# EAGLE board Orb Mainboard Rev B - 23 LEDs (EAGLE 9.7.0)
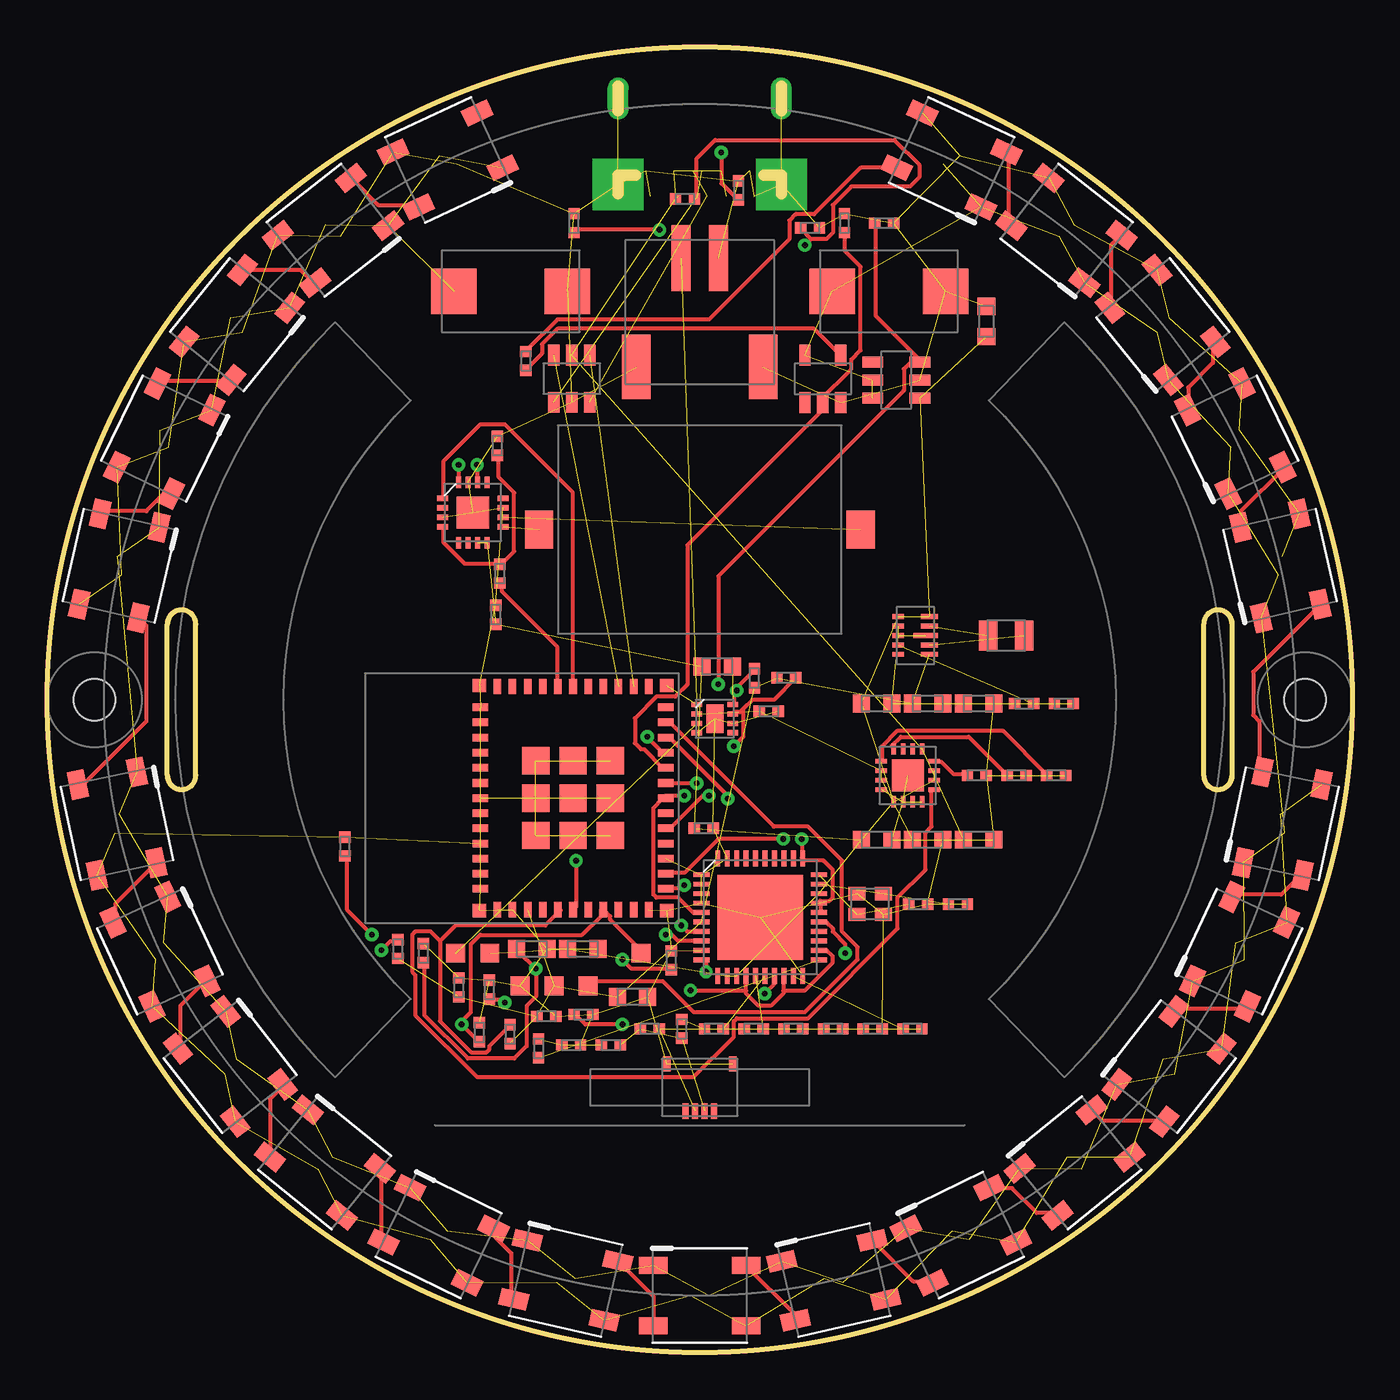
[diagram p0: board, top side]
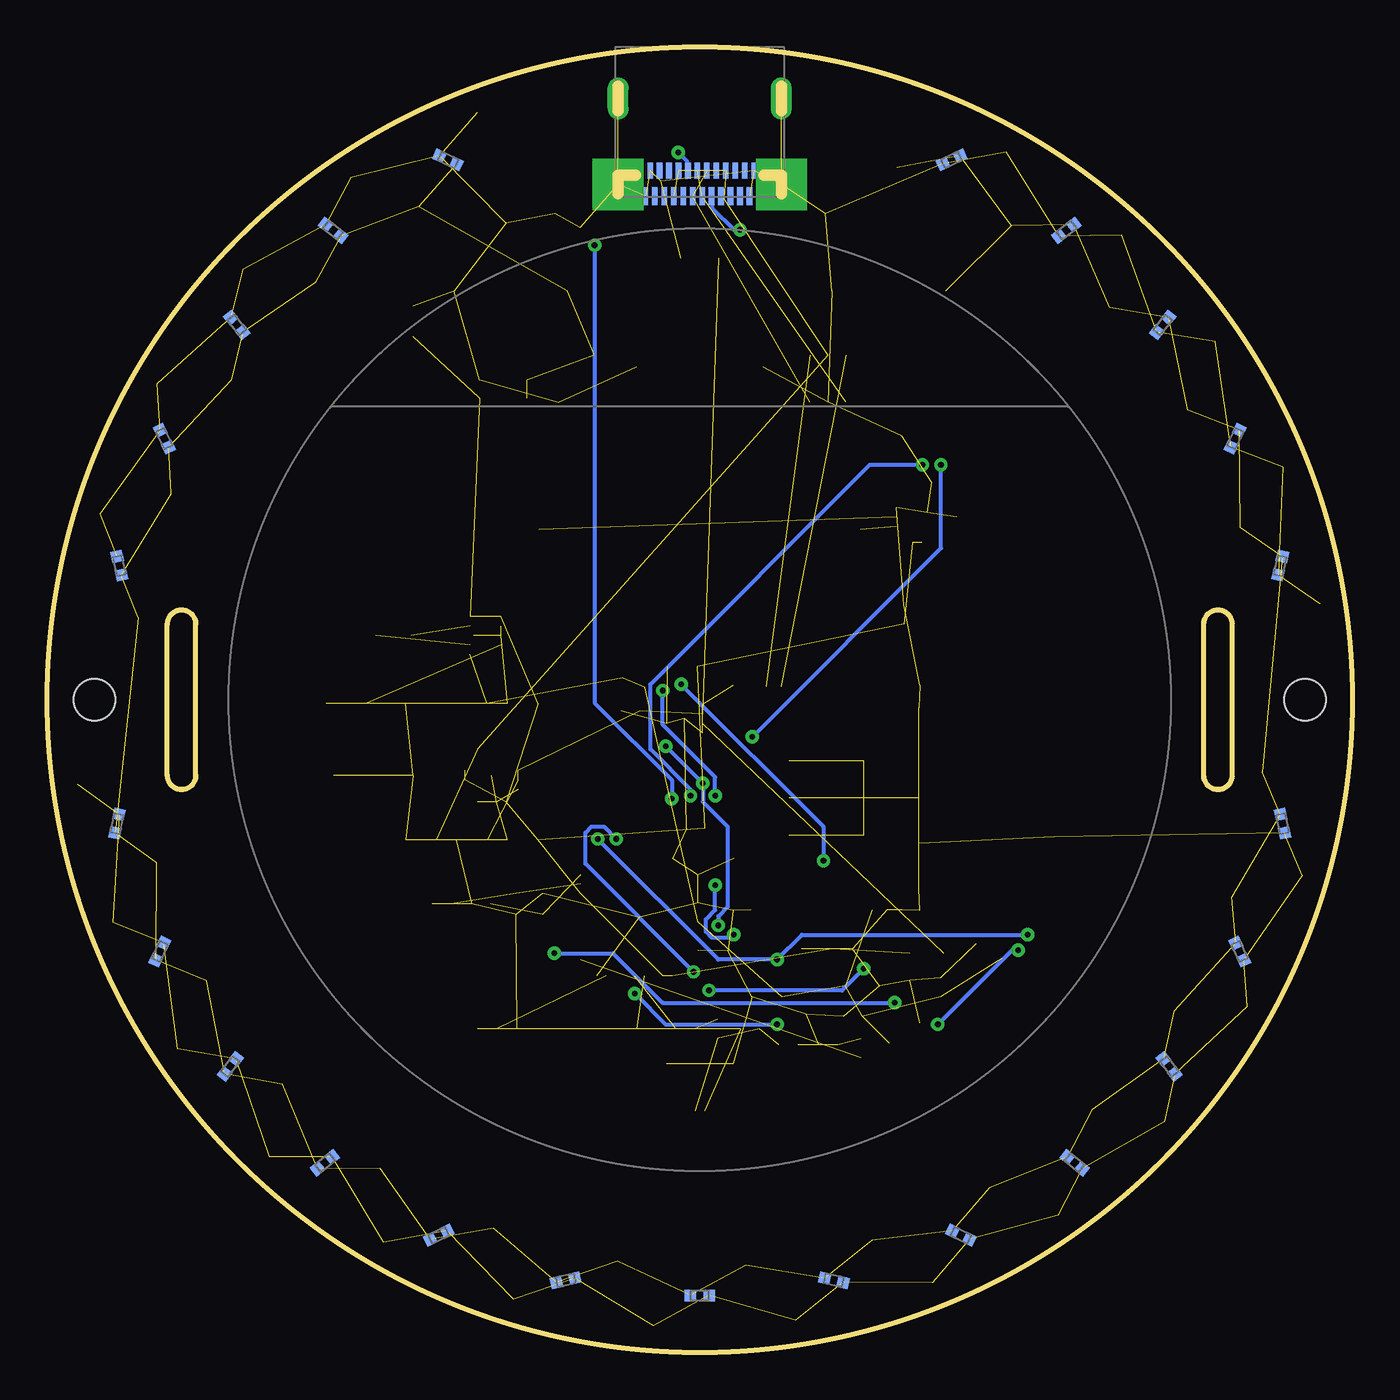
[diagram p1: board, bottom side, seen from below]

Size 69 x 69 mm. Coordinates in mm from the lower left corner, seen from the top.
Outline: 7.85,30.5 7.85,38.5 arc180 6.35,38.5 6.35,30.5 arc180 7.85,30.5
Outline: 62.65,30.5 62.65,38.5 arc180 61.15,38.5 61.15,30.5 arc180 62.65,30.5
Outline: circle at 34.5,34.5 radius 34.5
Copper layers (1*16): Top / Bottom
Stack-up Default Layer Stack: Top User Defined 0.035mm / Dielectric-1 User Defined 1.5mm / Bottom User Defined 0.035mm
Design rules: minimum drill size class=0 0.3mm, minimum drill size 0.3mm, minimum copper width class=0 0.2mm, minimum copper width 0.15mm, keepout clearance 0mil, drill distance 6mil, via restrict clearance 0mil, dimension clearance 0.25mm, restrict clearance 0mil, copper clearance wire_polygon to wire_polygon 5mil, copper clearance wire_polygon to pad_smd 5mil, copper clearance wire_polygon to via 5mil, copper clearance pad_smd to pad_smd 5mil, copper clearance pad_smd to via 5mil, copper clearance via to via 5mil, copper clearance smd to pad (same net) 5mil, copper clearance smd to via (same net) 5mil, copper clearance smd to smd (same net) 5mil
Net classes: 0 default: width 0.2 mm, drill 0.3 mm
Holes 2.2 mm at 2.5,34.5 66.5,34.5
RestrictCopper: area -0.1,32 to 5.1,37; area 63.9,32 to 69.1,37; area 49.7,14.5 to 62.3,54.5; area 6.7,14.5 to 19.3,54.5
vRestrict: area 49.7,14.5 to 62.3,54.5; area 6.7,14.5 to 19.3,54.5

## Footprints (pad centres in the part's own frame; a part is rotated, then mirrored left to right if it is on the bottom)
C0603 = smd 0.9 x 0.95: 1 -0.8,0; 2 0.8,0
C0402 = smd 0.6 x 0.6: 1 -0.5,0; 2 0.5,0
CPOL7343 = smd 2.4 x 2.4: 1 -3,0; 2 3,0
SOT23_6 = smd 0.6 x 1.1: 1 -0.95,-1.25; 2 0,-1.25; 3 0.95,-1.25; 4 0.95,1.25; 5 0,1.25; 6 -0.95,1.25
USBC24_TE2345986 = smd 0.3 x 0.95: A1 2.625,-7.875; A2 2.125,-7.875; A3 1.625,-7.875; A4 1.125,-7.875; A5 0.625,-7.875; A6 0.125,-7.875; A7 -0.375,-7.875; A8 -0.875,-7.875; A9 -1.375,-7.875; A10 -1.875,-7.875; A11 -2.375,-7.875; A12 -2.875,-7.875 | smd 0.3 x 0.85: B1 -2.625,-6.525; B2 -2.125,-6.525; B3 -1.625,-6.525; B4 -1.125,-6.525; B5 -0.625,-6.525; B6 -0.125,-6.525; B7 0.375,-6.525; B8 0.875,-6.525; B9 1.375,-6.525; B10 1.875,-6.525; B11 2.375,-6.525; B12 2.875,-6.525 | drill 0.6 pad 2.7 square: S1 -4.32,-7.25; S2 4.32,-7.25 | drill 0.6 pad 1.075 long: S3 -4.32,-2.7; S4 4.32,-2.7
JST_S2B_PH_SM4_TB = smd 1 x 3.5: 1 -1,2.85; 2 1,2.85 | smd 1.5 x 3.4: S1 -3.35,-2.9; S2 3.35,-2.9
FPC4_PLACEHOLDER = smd 0.3 x 0.8: 1 0.75,-1.25; 2 0.25,-1.25; 3 -0.25,-1.25; 4 -0.75,-1.25 | smd 0.4 x 0.8: M1 -1.75,1.25; M2 1.75,1.25
L2016 = smd 1 x 1.6: 1 -0.95,0; 2 0.95,0
L0402 = smd 0.6 x 0.6: 1 -0.5,0; 2 0.5,0
WS2812B_5050 = smd 1.5 x 0.9: 1 -2.45,1.6; 2 -2.45,-1.6; 3 2.45,-1.6; 4 2.45,1.6
R0402 = smd 0.6 x 0.6: 1 -0.5,0; 2 0.5,0
SPK_PADS = smd 1.5 x 2: 1 -8.5,0; 2 8.5,0
TP1MM = smd 1 x 1: 1 0,0
ESP32C3MINI1_PLACEHOLDER = smd 0.8 x 0.4: 1 -5.9,1.3; 2 -5.9,0.5; 3 -5.9,-0.3; 4 -5.9,-1.1; 5 -5.9,-1.9; 6 -5.9,-2.7; 7 -5.9,-3.5; 8 -5.9,-4.3; 9 -5.9,-5.1; 10 -5.9,-5.9; 11 -5.9,-6.7; 25 5.9,-6.7; 26 5.9,-5.9; 27 5.9,-5.1; 28 5.9,-4.3; 29 5.9,-3.5; 30 5.9,-2.7; 31 5.9,-1.9; 32 5.9,-1.1; 33 5.9,-0.3; 34 5.9,0.5; 35 5.9,1.3 | smd 0.4 x 0.8: 12 -4.8,-7.6; 13 -4,-7.6; 14 -3.2,-7.6; 15 -2.4,-7.6; 16 -1.6,-7.6; 17 -0.8,-7.6; 18 0,-7.6; 19 0.8,-7.6; 20 1.6,-7.6; 21 2.4,-7.6; 22 3.2,-7.6; 23 4,-7.6; 24 4.8,-7.6; 36 4.8,2.2; 37 4,2.2; 38 3.2,2.2; 39 2.4,2.2; 40 1.6,2.2; 41 0.8,2.2; 42 0,2.2; 43 -0.8,2.2; 44 -1.6,2.2; 45 -2.4,2.2; 46 -3.2,2.2; 47 -4,2.2; 48 -4.8,2.2 | smd 1.45 x 1.45: 49 -1.975,-0.725; 49_1 -1.975,-2.7; 49_2 -1.975,-4.675; 49_3 0,-0.725; 49_4 0,-2.7; 49_5 0,-4.675; 49_6 1.975,-0.725; 49_7 1.975,-2.7; 49_8 1.975,-4.675 | smd 0.7 x 0.7: 50 5.95,2.25; 51 5.95,-7.65; 52 -5.95,-7.65; 53 -5.95,2.25
HVQFN40_6X6 = smd 0.85 x 0.25: 1 -3.1,2.25; 2 -3.1,1.75; 3 -3.1,1.25; 4 -3.1,0.75; 5 -3.1,0.25; 6 -3.1,-0.25; 7 -3.1,-0.75; 8 -3.1,-1.25; 9 -3.1,-1.75; 10 -3.1,-2.25; 21 3.1,-2.25; 22 3.1,-1.75; 23 3.1,-1.25; 24 3.1,-0.75; 25 3.1,-0.25; 26 3.1,0.25; 27 3.1,0.75; 28 3.1,1.25; 29 3.1,1.75; 30 3.1,2.25 | smd 0.25 x 0.85: 11 -2.25,-3.1; 12 -1.75,-3.1; 13 -1.25,-3.1; 14 -0.75,-3.1; 15 -0.25,-3.1; 16 0.25,-3.1; 17 0.75,-3.1; 18 1.25,-3.1; 19 1.75,-3.1; 20 2.25,-3.1; 31 2.25,3.1; 32 1.75,3.1; 33 1.25,3.1; 34 0.75,3.1; 35 0.25,3.1; 36 -0.25,3.1; 37 -0.75,3.1; 38 -1.25,3.1; 39 -1.75,3.1; 40 -2.25,3.1 | smd 4.5 x 4.5: 41 0,0
TDFN8_2X2 = smd 0.55 x 0.28: 1 -0.95,0.75; 2 -0.95,0.25; 3 -0.95,-0.25; 4 -0.95,-0.75; 5 0.95,-0.75; 6 0.95,-0.25; 7 0.95,0.25; 8 0.95,0.75 | smd 0.9 x 1.5: 9 0,0
VQFN16_3X3 = smd 0.6 x 0.24: 1 -1.4,0.75; 2 -1.4,0.25; 3 -1.4,-0.25; 4 -1.4,-0.75; 9 1.4,-0.75; 10 1.4,-0.25; 11 1.4,0.25; 12 1.4,0.75 | smd 0.24 x 0.6: 5 -0.75,-1.4; 6 -0.25,-1.4; 7 0.25,-1.4; 8 0.75,-1.4; 13 0.75,1.4; 14 0.25,1.4; 15 -0.25,1.4; 16 -0.75,1.4 | smd 1.68 x 1.68: 17 0,0
VSON10_2X3 = smd 0.6 x 0.25: 1 -0.9,1; 2 -0.9,0.5; 3 -0.9,0; 4 -0.9,-0.5; 5 -0.9,-1 | smd 0.9 x 0.25: 6 0.75,-1; 7 0.75,-0.5; 9 0.75,0.5; 10 0.75,1 | smd 1.3 x 0.25: 8 0.55,0
TQFN16_3X3 = smd 0.6 x 0.28: 1 -1.6,0.75; 2 -1.6,0.25; 3 -1.6,-0.25; 4 -1.6,-0.75; 9 1.6,-0.75; 10 1.6,-0.25; 11 1.6,0.25; 12 1.6,0.75 | smd 0.28 x 0.6: 5 -0.75,-1.6; 6 -0.25,-1.6; 7 0.25,-1.6; 8 0.75,-1.6; 13 0.75,1.6; 14 0.25,1.6; 15 -0.25,1.6; 16 -0.75,1.6 | smd 1.7 x 1.7: 17 0,0
SOT23_5 = smd 0.6 x 1.1: 1 -0.95,-1.25; 2 0,-1.25; 3 0.95,-1.25; 4 0.95,1.25; 5 -0.95,1.25
XTAL2016 = smd 0.9 x 0.7: 1 -0.7,-0.55; 2 0.7,-0.55; 3 0.7,0.55; 4 -0.7,0.55

## Placement (x,y rotation side)
C1  10uF  [C0603]  30.95,18.8 0 top
C2  100nF  [C0402]  26.39,17.76 0 top
C3  1uF  [C0402]  22.85,16.92 90 top
C4  4.7uF  [C0603]  49.25,27.1 0 top
C5  10uF  [C0603]  43.85,27.1 0 top
C6  10uF  [C0603]  46.55,27.1 0 top
C7  100nF  [C0402]  38.15,33.9 0 top
C8  10uF  [C0603]  43.85,34.3 0 top
C9  10uF  [C0603]  46.55,34.3 0 top
C10  10uF  [C0603]  49.25,34.3 0 top
C11  100nF  [C0402]  34.71,27.7 0 top
C12  4.7uF  [C0603]  28.32,21.33 0 top
C13  4.7uF  [C0603]  25.62,21.33 0 top
C14  100nF  [C0402]  19.89,21.1 90 top
C15  1uF  [C0402]  15.74,26.74 90 top
C16  100nF  [C0402]  33,20.72 90 top
C17  100nF  [C0402]  28.35,17.86 0 top
C18  100nF  [C0402]  23.38,19.17 90 top
C19  100nF  [C0402]  21.77,19.29 90 top
C20  12pF  [C0402]  46.05,23.7 0 top
C21  12pF  [C0402]  48.15,23.7 0 top
C22  TBD  [C0402]  27.7,16.25 0 top
C23  TBD  [C0402]  43.65,17.1 0 top
C24  TBD  [C0402]  29.8,16.25 0 top
C25  TBD  [C0402]  41.55,17.1 0 top
C26  TBD  [C0402]  31.85,17.1 0 top
C27  TBD  [C0402]  33.55,17.1 90 top
C28  TBD  [C0402]  39.45,17.1 0 top
C29  10uF  [C0603]  35.42,36.27 0 top
C30  100nF  [C0402]  23.71,39 90 top
C31  10uF  [C0603]  49.65,54.5 90 top
C32  100uF  [CPOL7343]  24.5,56.1 0 top
C33  100uF  [CPOL7343]  44.5,56.1 0 top
C101  100nF  [C0402]  47.81,63.05 155 bottom
C102  100nF  [C0402]  53.89,59.32 142 bottom
C103  100nF  [C0402]  58.98,54.32 129 bottom
C104  100nF  [C0402]  62.81,48.31 116 bottom
C105  100nF  [C0402]  65.19,41.59 103 bottom
C106  100nF  [C0402]  65.31,27.95 78 bottom
C107  100nF  [C0402]  63.05,21.19 65 bottom
C108  100nF  [C0402]  59.32,15.11 52 bottom
C109  100nF  [C0402]  54.32,10.02 39 bottom
C110  100nF  [C0402]  48.31,6.19 26 bottom
C111  100nF  [C0402]  41.59,3.81 13 bottom
C112  100nF  [C0402]  34.5,3 0 bottom
C113  100nF  [C0402]  27.41,3.81 347 bottom
C114  100nF  [C0402]  20.69,6.19 334 bottom
C115  100nF  [C0402]  14.68,10.02 321 bottom
C116  100nF  [C0402]  9.68,15.11 308 bottom
C117  100nF  [C0402]  5.95,21.19 295 bottom
C118  100nF  [C0402]  3.69,27.95 282 bottom
C119  100nF  [C0402]  3.81,41.59 257 bottom
C120  100nF  [C0402]  6.19,48.31 244 bottom
C121  100nF  [C0402]  10.02,54.32 231 bottom
C122  100nF  [C0402]  15.11,59.32 218 bottom
C123  100nF  [C0402]  21.19,63.05 205 bottom
D1  USBLC6-2SC6  [SOT23_6]  27.73,51.48 0 top
J1  USB-C  [USBC24_TE2345986]  34.5,69 0 bottom
J2  BAT  [JST_S2B_PH_SM4_TB]  34.5,55 0 top
J3  NFC antenna  [FPC4_PLACEHOLDER]  34.5,14 0 top
L1  0.47uH  [L2016]  50.7,37.9 0 top
L2  TBD  [L0402]  25.98,16.07 90 top
L3  TBD  [L0402]  45.75,17.1 0 top
LED1  WS2812B  [WS2812B_5050]  47.81,63.05 155 top
LED2  WS2812B  [WS2812B_5050]  53.89,59.32 142 top
LED3  WS2812B  [WS2812B_5050]  58.98,54.32 129 top
LED4  WS2812B  [WS2812B_5050]  62.81,48.31 116 top
LED5  WS2812B  [WS2812B_5050]  65.19,41.59 103 top
LED6  WS2812B  [WS2812B_5050]  65.31,27.95 78 top
LED7  WS2812B  [WS2812B_5050]  63.05,21.19 65 top
LED8  WS2812B  [WS2812B_5050]  59.32,15.11 52 top
LED9  WS2812B  [WS2812B_5050]  54.32,10.02 39 top
LED10  WS2812B  [WS2812B_5050]  48.31,6.19 26 top
LED11  WS2812B  [WS2812B_5050]  41.59,3.81 13 top
LED12  WS2812B  [WS2812B_5050]  34.5,3 0 top
LED13  WS2812B  [WS2812B_5050]  27.41,3.81 347 top
LED14  WS2812B  [WS2812B_5050]  20.69,6.19 334 top
LED15  WS2812B  [WS2812B_5050]  14.68,10.02 321 top
LED16  WS2812B  [WS2812B_5050]  9.68,15.11 308 top
LED17  WS2812B  [WS2812B_5050]  5.95,21.19 295 top
LED18  WS2812B  [WS2812B_5050]  3.69,27.95 282 top
LED19  WS2812B  [WS2812B_5050]  3.81,41.59 257 top
LED20  WS2812B  [WS2812B_5050]  6.19,48.31 244 top
LED21  WS2812B  [WS2812B_5050]  10.02,54.32 231 top
LED22  WS2812B  [WS2812B_5050]  15.11,59.32 218 top
LED23  WS2812B  [WS2812B_5050]  21.19,63.05 205 top
R1  10k  [R0402]  18.53,21.32 90 top
R3  100k  [R0402]  24.47,16.82 90 top
R4  5.1k  [R0402]  27.85,59.7 90 top
R5  5.1k  [R0402]  36.55,61.43 90 top
R6  120k  [R0402]  33.72,60.99 0 top
R7  220k  [R0402]  40.33,59.45 0 top
R8  1.8k  [R0402]  49.15,30.5 0 top
R9  1.13k  [R0402]  51.25,30.5 0 top
R10  10k  [R0402]  53.35,30.5 0 top
R11  560k  [R0402]  51.65,34.3 0 top
R12  100k  [R0402]  53.75,34.3 0 top
R13  2.2k  [R0402]  37.39,35.64 90 top
R14  2.2k  [R0402]  39.08,35.66 0 top
R15  TBD  [R0402]  35.25,17.1 0 top
R16  TBD  [R0402]  37.35,17.1 0 top
R17  2k  [R0402]  23.92,41.17 90 top
R18  100k  [R0402]  23.8,47.93 90 top
R19  100k  [R0402]  44.25,59.7 0 top
R20  100k  [R0402]  42.15,59.7 90 top
R21  33  [R0402]  25.31,52.41 90 top
SPK1  CMS-151103-088SP  [SPK_PADS]  34.5,43.5 0 top
TP1  EN  [TP1MM]  31.4,21.1 0 top
TP2  BOOT  [TP1MM]  28.6,19.37 0 top
TP3  3V3  [TP1MM]  26.8,19.37 0 top
TP4  GND  [TP1MM]  25,19.37 0 top
TP5  VSYS  [TP1MM]  23.4,21.1 0 top
TP6  VBAT  [TP1MM]  21.6,21.1 0 top
U1  ESP32-C3-MINI-1-N4X  [ESP32C3MINI1_PLACEHOLDER]  25.1,29.3 90 top
U2  PN7161A1HN/C101E  [HVQFN40_6X6]  37.7,23 0 top
U3  MAX17048G+T10  [TDFN8_2X2]  35.3,33.5 0 top
U4  BQ24074RGTR  [VQFN16_3X3]  45.5,30.5 0 top
U5  TPS63802DLAR  [VSON10_2X3]  45.9,37.9 0 top
U6  MAX98357AETE+T  [TQFN16_3X3]  22.5,44.4 0 top
U7  TPS22918DBVR  [SOT23_6]  44.89,51.4 90 top
U8  SN74LV1T34DBVR  [SOT23_5]  41.01,51.47 0 top
Y1  27.12MHz  [XTAL2016]  43.5,23.7 0 top

## Library data of the parts
C1-C33 C101-C123 D1 J1-J3 L1-L3 LED1-LED23 R1 R3-R21 SPK1 TP1-TP6 U1-U8 Y1 = orb

## Nets
3V3: C1.1 C2.1 C9.1 C10.1 C19.1 R1.1 R3.1 R11.1 R13.1 R14.1 TP3.1 U1.3 U2.6 U5.6
AMP_SD: R17.1 U1.31
AMP_SD_R: R17.2 R18.1 U6.4
BOOT: TP2.1 U1.23
CC1: J1.A5 R4.1
CC2: J1.B5 R5.1
CHG_STATUS: R3.2 U1.5 U4.9
EN: C3.1 R1.2 TP1.1 U1.8
FB_3V3: R11.2 R12.1 U5.4
GND: C1.2 C2.2 C3.2 C4.2 C5.2 C6.2 C7.2 C8.2 C9.2 C10.2 C11.2 C12.2 C13.2 C14.2 C15.2 C16.2 C17.2 C18.2 C19.2 C20.2 C21.2 C22.2 C23.2 C29.2 C30.2 C31.2 C32.2 C33.2 C101.2 C102.2 C103.2 C104.2 C105.2 C106.2 C107.2 C108.2 C109.2 C110.2 C111.2 C112.2 C113.2 C114.2 C115.2 C116.2 C117.2 C118.2 C119.2 C120.2 C121.2 C122.2 C123.2 D1.2 J1.A1 J1.A12 J1.B1 J1.B12 J1.S1 J1.S2 J1.S3 J1.S4 J2.2 J2.S1 J2.S2 J3.M1 J3.M2 LED1.3 LED2.3 LED3.3 LED4.3 LED5.3 LED6.3 LED7.3 LED8.3 LED9.3 LED10.3 LED11.3 LED12.3 LED13.3 LED14.3 LED15.3 LED16.3 LED17.3 LED18.3 LED19.3 LED20.3 LED21.3 LED22.3 LED23.3 R4.2 R5.2 R7.2 R8.2 R9.2 R10.2 R12.2 R18.2 R19.2 R20.2 TP4.1 U1.1 U1.2 U1.11 U1.14 U1.36 U1.37 U1.38 U1.39 U1.40 U1.41 U1.42 U1.43 U1.44 U1.45 U1.46 U1.47 U1.48 U1.49 U1.49_1 U1.49_2 U1.49_3 U1.49_4 U1.49_5 U1.49_6 U1.49_7 U1.49_8 U1.50 U1.51 U1.52 U1.53 U2.1 U2.2 U2.3 U2.4 U2.9 U2.20 U2.39 U2.41 U3.1 U3.4 U3.6 U3.9 U4.4 U4.6 U4.8 U4.17 U5.2 U5.3 U5.8 U6.3 U6.11 U6.15 U6.17 U7.2 U8.3 Y1.2 Y1.4
I2C_SCL: R14.2 U1.19 U2.7 U3.7
I2C_SDA: R13.2 U1.18 U2.5 U3.8
I2S_BCLK: U1.21 U6.16
I2S_DIN: U1.30 U6.1
I2S_LRCLK: U1.16 U6.14
ILIM: R8.1 U4.12
ISET: R9.1 U4.16
LED_CHAIN_1: LED1.2 LED2.4
LED_CHAIN_2: LED2.2 LED3.4
LED_CHAIN_3: LED3.2 LED4.4
LED_CHAIN_4: LED4.2 LED5.4
LED_CHAIN_5: LED5.2 LED6.4
LED_CHAIN_6: LED6.2 LED7.4
LED_CHAIN_7: LED7.2 LED8.4
LED_CHAIN_8: LED8.2 LED9.4
LED_CHAIN_9: LED9.2 LED10.4
LED_CHAIN_10: LED10.2 LED11.4
LED_CHAIN_11: LED11.2 LED12.4
LED_CHAIN_12: LED12.2 LED13.4
LED_CHAIN_13: LED13.2 LED14.4
LED_CHAIN_14: LED14.2 LED15.4
LED_CHAIN_15: LED15.2 LED16.4
LED_CHAIN_16: LED16.2 LED17.4
LED_CHAIN_17: LED17.2 LED18.4
LED_CHAIN_18: LED18.2 LED19.4
LED_CHAIN_19: LED19.2 LED20.4
LED_CHAIN_20: LED20.2 LED21.4
LED_CHAIN_21: LED21.2 LED22.4
LED_CHAIN_22: LED22.2 LED23.4
LED_DATA_0: LED1.4 R21.2
LED_DATA_3V3: R20.1 U1.20 U8.2
LED_DATA_BUF: R21.1 U8.4
LED_EN: R19.1 U1.6 U7.3
NFC_ANT_N: C25.2 C26.2 C28.1 J3.3
NFC_ANT_P: C24.2 C26.1 C27.1 J3.2
NFC_EMC1: C22.1 C24.1 L2.2
NFC_EMC2: C23.1 C25.1 L3.2
NFC_IRQ: U1.12 U2.8
NFC_RXC1: C27.2 R15.1
NFC_RXC2: C28.2 R16.1
NFC_RXN: R16.2 U2.15
NFC_RXP: R15.2 U2.16
NFC_TX1: L2.1 U2.21
NFC_TX2: L3.1 U2.19
NFC_VDD: C15.1 C16.1 U2.26 U2.27 U2.31
NFC_VDDHF: C18.1 U2.25
NFC_VEN: U1.13 U2.10
NFC_VMID: C17.1 U2.17
NFC_XTAL1: C20.1 U2.30 Y1.1
NFC_XTAL2: C21.1 U2.29 Y1.3
SPK_N: SPK1.2 U6.10
SPK_P: SPK1.1 U6.9
SW1: L1.1 U5.9
SW2: L1.2 U5.7
TS: R10.1 U4.1
USB_DN: D1.4 U1.26
USB_DN_J: D1.3 J1.A7 J1.B7
USB_DP: D1.6 U1.27
USB_DP_J: D1.1 J1.A6 J1.B6
VBAT: C6.1 C7.1 J2.1 TP6.1 U3.2 U3.3 U4.2 U4.3
VBUS: C4.1 D1.5 J1.A4 J1.A9 J1.B4 J1.B9 R6.1 U4.13
VBUS_SENSE: R6.2 R7.1 U1.22
VDD_TX: C13.1 C14.1 U2.14 U2.18 U2.22
VLED: C32.1 C33.1 C101.1 C102.1 C103.1 C104.1 C105.1 C106.1 C107.1 C108.1 C109.1 C110.1 C111.1 C112.1 C113.1 C114.1 C115.1 C116.1 C117.1 C118.1 C119.1 C120.1 C121.1 C122.1 C123.1 LED1.1 LED2.1 LED3.1 LED4.1 LED5.1 LED6.1 LED7.1 LED8.1 LED9.1 LED10.1 LED11.1 LED12.1 LED13.1 LED14.1 LED15.1 LED16.1 LED17.1 LED18.1 LED19.1 LED20.1 LED21.1 LED22.1 LED23.1 U7.5 U7.6 U8.5
VSYS: C5.1 C8.1 C11.1 C12.1 C29.1 C30.1 C31.1 TP5.1 U2.12 U2.13 U2.28 U4.5 U4.10 U4.11 U5.1 U5.10 U6.7 U6.8 U7.1

## Tracks (layer width: path | path; a pad name or v marks a point on that pad's centre or on a via)
3V3  (13 unrouted)
AMP_SD
  Top 0.2: R17.1 24.04,40.55 24.04,40.22 26.98,37.28 26.98,35.32 U1.31
AMP_SD_R
  Top 0.2: U6.4 20.93,43.66 20.93,42.84 22.07,41.69 23.87,41.69 R17.2 24.04,41.69 24.69,42.35 24.69,45.45 23.87,46.27 23.87,47.42 R18.1
BOOT
  Top 0.2: U1.23 32.7,33.19 33.03,33.19 38.42,27.8 40.22,27.8 42.02,26 42.02,22.24 42.84,21.42 42.84,20.77 40.06,17.99 34.17,17.99 32.54,19.62 28.78,19.62 28.61,19.46 TP2.1
CC1  (via drill 0.3)
  Top 0.2: v32.37,59.35 27.96,59.35 R4.1
  Bottom 0.2: v32.37,59.35 32.7,59.35 33.85,60.5 33.85,60.99 J1.A5
CC2  (via drill 0.3)
  Top 0.2: v35.65,63.44 35.65,61.8 36.46,60.99 R5.1
  Bottom 0.2: v35.65,63.44 35.15,62.95 35.15,62.62 J1.B5
CHG_STATUS
  Top 0.2: 20.77,21.75 20.77,17.5 22.4,15.86 23.22,15.86 23.38,16.02 23.38,16.19 24.36,17.17 R3.2 | 20.77,21.75 21.58,22.56 26.32,22.56 27.14,23.38 U1.5 | 20.77,21.75 20.27,22.24 19.46,22.24 19.29,22.07 19.29,20.11 19.46,19.95 19.46,17.82 22.73,14.55 34.17,14.55 36.3,16.68 36.3,17.5 36.46,17.66 40.22,17.66 44.96,22.4 44.96,24.04 46.44,25.51 46.44,27.47 46.76,27.8 46.76,29.76 U4.9
EN  (via drill 0.3)
  Top 0.2: TP1.1 31.39,21.26 29.76,22.89 29.76,23.05 29.43,23.38 U1.8 29.27,23.38 29.27,23.05 28.29,22.07 22.89,22.07 22.4,21.58 22.4,17.99 21.91,17.5 v21.91,17.33 22.73,16.52 C3.1 | v17.66,21.26 18.15,21.75 18.48,21.75 R1.2
  Bottom 0.2: v17.66,21.26 17.99,21.26 v21.91,17.33
FB_3V3  (2 unrouted)
GND  (155 unrouted)
I2C_SCL  (via drill 0.3)
  Top 0.2: 36.79,34.01 37.28,34.5 38.42,34.5 39.57,35.65 R14.2 | 36.79,34.01 36.63,33.85 36.3,33.85 U3.7 | v34.34,30.09 32.7,30.09 U1.19 | v36.3,32.05 36.79,32.54 36.79,34.01 | v33.52,22.56 33.85,22.24 34.5,22.24 U2.7
  Bottom 0.2: v36.3,32.05 v34.34,30.09 34.34,29.1 33.03,27.8 33.03,23.55 33.52,23.05 v33.52,22.56
I2C_SDA  (via drill 0.3)
  Top 0.2: 36.3,34.99 36.3,34.34 U3.8 | 36.3,34.99 37.44,36.13 R13.2 | U2.5 34.5,23.22 34.17,23.22 33.35,24.04 32.21,24.04 32.05,24.2 32.05,28.78 32.54,29.27 U1.18 32.7,29.43 v33.68,29.43 | v36.46,34.99 36.3,34.99
  Bottom 0.2: v36.46,34.99 36.46,33.19 33.68,30.41 v33.68,29.43
I2S_BCLK  (via drill 0.3)
  Top 0.2: v21.75,46.93 21.75,46.11 U6.16 | v31.72,32.54 32.54,31.72 U1.21
  Bottom 0.2: v21.75,46.93 21.75,42.51 v31.72,32.54
I2S_DIN
  Top 0.2: U6.1 20.93,45.13 20.93,47.09 22.89,49.05 24.2,49.05 27.8,45.45 27.8,35.32 U1.30
I2S_LRCLK  (via drill 0.3)
  Top 0.2: v22.73,46.93 22.73,46.11 U6.14 | v34.99,29.43 34.66,29.43 33.03,27.8 32.7,27.8 U1.16
  Bottom 0.2: v22.73,46.93 25.51,46.93 37.12,35.32 37.12,31.88 34.99,29.76 v34.99,29.43
ILIM
  Top 0.2: R8.1 48.56,30.58 47.91,30.58 47.25,31.23 46.93,31.23 U4.12
ISET
  Top 0.2: R9.1 50.69,30.58 48.73,32.54 45.13,32.54 44.64,32.05 U4.16
LED_CHAIN_1
  Top 0.2: LED1.2 50.85,63.44 50.85,59.68 LED2.4
LED_CHAIN_2
  Top 0.2: LED3.4 56.25,55.27 56.25,58.53 56.74,59.02 LED2.2
LED_CHAIN_3
  Top 0.2: LED4.4 60.33,49.87 60.33,51.01 61.64,52.32 61.64,53.3 LED3.2
LED_CHAIN_4
  Top 0.2: LED5.4 63.11,43.66 63.11,44.47 65.4,46.76 LED4.2
LED_CHAIN_5
  Top 0.2: LED6.4 64.09,30.74 64.09,33.35 63.77,33.68 63.77,35.97 67.2,39.41 LED5.2
LED_CHAIN_6
  Top 0.2: LED7.4 62.78,24.2 65.24,24.2 66.22,25.18 LED6.2
LED_CHAIN_7
  Top 0.2: LED8.4 59.68,18.15 63.44,18.15 LED7.2
LED_CHAIN_8
  Top 0.2: LED8.2 59.02,12.26 55.75,12.26 55.27,12.75 LED9.4
LED_CHAIN_9
  Top 0.2: LED10.4 49.87,8.67 51.01,8.67 52.32,7.36 53.3,7.36 LED9.2
LED_CHAIN_10
  Top 0.2: LED10.2 46.76,3.76 45.78,3.76 43.66,5.89 LED11.4
LED_CHAIN_11
  Top 0.2: LED11.2 39.41,1.8 39.41,2.13 36.95,4.58 LED12.4
LED_CHAIN_12
  Top 0.2: LED12.2 32.05,1.47 32.05,2.95 30.25,4.74 LED13.4
LED_CHAIN_13
  Top 0.2: LED13.2 24.53,2.95 24.53,5.23 23.71,6.05 23.71,6.54 LED14.4
LED_CHAIN_14
  Top 0.2: LED14.2 17.66,5.89 17.66,9.65 LED15.4
LED_CHAIN_15
  Top 0.2: LED15.2 11.77,10.46 11.77,13.41 12.43,14.06 LED16.4
LED_CHAIN_16
  Top 0.2: LED16.2 7.03,16.19 7.03,18.31 8.34,19.62 LED17.4
LED_CHAIN_17
  Top 0.2: LED17.2 3.6,22.89 3.6,23.71 5.72,25.84 LED18.4
LED_CHAIN_18
  Top 0.2: LED18.2 1.64,30.09 1.96,30.09 5.23,33.35 5.23,38.42 4.91,38.75 LED19.4
LED_CHAIN_19
  Top 0.2: LED19.2 2.95,44.47 5.23,44.47 6.05,45.29 6.54,45.29 LED20.4
LED_CHAIN_20
  Top 0.2: LED20.2 5.89,51.34 9.65,51.34 LED21.4
LED_CHAIN_21
  Top 0.2: LED21.2 10.46,57.23 13.41,57.23 14.06,56.57 LED22.4
LED_CHAIN_22
  Top 0.2: LED23.4 19.62,60.66 17.5,60.66 16.19,61.97 LED22.2
LED_DATA_0
  Top 0.2: R21.2 25.34,52.98 26.98,54.61 34.99,54.61 39.24,58.86 39.24,59.84 39.57,60.17 40.55,60.17 43,62.62 44.8,62.62 LED1.4
LED_DATA_3V3
  Top 0.2: R20.1 42.18,59.19 42.18,58.21 43,57.39 43,52.98 42.51,52.48 42.51,51.99 40.88,50.36 U8.2 40.88,50.2 40.88,49.71 33.85,42.67 33.85,35.32 33.19,34.66 32.21,34.66 31.07,33.52 31.07,32.21 31.39,31.88 31.56,31.88 32.54,30.9 U1.20
LED_DATA_BUF
  Top 0.2: R21.1 25.34,51.99 26.16,52.81 26.16,53.3 26.98,54.12 40.55,54.12 41.86,52.81 U8.4
LED_EN  (via drill 0.3)
  Top 0.2: 45.95,52.65 46.11,52.48 U7.3 45.95,52.65 | 45.95,52.65 43.82,54.77 43.82,59.68 R19.1 | v27.96,26 27.96,23.55 U1.6 | v35.48,35.32 35.48,41.04 45.29,50.85 45.29,51.99 45.95,52.65
  Bottom 0.2: v27.96,26 27.96,27.8 v35.48,35.32
NFC_ANT_N  (3 unrouted)
NFC_ANT_P  (3 unrouted)
NFC_EMC1  (2 unrouted)
NFC_EMC2  (2 unrouted)
NFC_IRQ  (via drill 0.3)
  Top 0.2: v33.68,24.69 33.52,24.53 32.7,24.53 U1.12 | v32.7,22.07 33.03,22.07 33.35,21.75 34.5,21.75 U2.8
  Bottom 0.2: v33.68,24.69 33.68,23.38 34.17,22.89 34.17,22.24 33.85,21.91 32.87,21.91 v32.7,22.07
NFC_RXC1  (1 unrouted)
NFC_RXC2  (1 unrouted)
NFC_RXN  (1 unrouted)
NFC_RXP  (1 unrouted)
NFC_TX1  (1 unrouted)
NFC_TX2  (1 unrouted)
NFC_VDD  (via drill 0.3)
  Top 0.2: U2.26 40.88,23.22 40.88,23.71 U2.27 40.88,23.87 41.37,23.87 41.53,24.04 41.53,25.51 41.04,26 40.06,26 U2.31 39.9,26.16 v39.9,27.14 | v17.17,22.07 15.86,23.38 15.86,26.16 C15.1 | v30.41,20.77 30.9,20.27 32.87,20.27 C16.1
  Bottom 0.2: v17.17,22.07 29.1,22.07 v30.41,20.77 33.52,20.77 v39.9,27.14
NFC_VDDHF  (via drill 0.3)
  Top 0.2: v24.2,18.48 24.04,18.64 23.38,18.64 C18.1 | v42.18,21.09 42.18,21.58 41.53,22.24 41.53,22.4 41.2,22.73 40.88,22.73 U2.25
  Bottom 0.2: v24.2,18.48 36.46,18.48 39.08,21.09 v42.18,21.09
NFC_VEN  (via drill 0.3)
  Top 0.2: v38.91,27.14 35.48,27.14 33.68,25.34 32.7,25.34 U1.13 | v34.83,20.11 34.83,20.6 34.66,20.77 U2.10
  Bottom 0.2: v38.91,27.14 39.57,27.8 40.22,27.8 40.55,27.47 40.55,25.84 v34.83,20.11
NFC_VMID  (via drill 0.3)
  Top 0.2: v30.41,17.33 28.45,17.33 27.96,17.82 C17.1 | v37.93,18.97 38.42,19.46 38.42,19.79 U2.17
  Bottom 0.2: v30.41,17.33 36.3,17.33 v37.93,18.97
NFC_XTAL1  (2 unrouted)
NFC_XTAL2  (2 unrouted)
SPK_N  (1 unrouted)
SPK_P  (1 unrouted)
SW1  (1 unrouted)
SW2  (1 unrouted)
TS
  Top 0.2: R10.1 52.81,30.58 50.52,32.87 44.96,32.87 44.15,32.05 44.15,31.23 U4.1
USB_DN  (1 unrouted)
USB_DN_J  (2 unrouted)
USB_DP  (1 unrouted)
USB_DP_J  (2 unrouted)
VBAT  (7 unrouted)
VBUS  (7 unrouted)
VBUS_SENSE  (via drill 0.3)
  Top 0.2: 40.39,58.86 39.9,59.35 R7.1 | 40.39,58.86 41.2,58.86 41.53,59.19 41.53,60.66 42.51,61.64 45.62,61.64 46.11,62.13 46.11,62.78 44.8,64.09 35.32,64.09 34.34,63.11 34.34,61.15 R6.2 | v35.97,29.27 35.97,29.43 33.03,32.37 32.7,32.37 U1.22 | 40.39,58.86 v40.06,58.53
  Bottom 0.2: v35.97,29.27 35.97,30.25 40.06,34.34 v40.06,58.53
VDD_TX  (via drill 0.3)
  Top 0.2: 36.95,19.13 36.95,18.97 37.61,18.31 38.26,18.31 38.91,18.97 38.91,19.13 | 36.95,19.13 36.95,19.79 U2.14 | 38.91,19.13 38.91,19.79 U2.18 | 38.91,19.13 40.06,19.13 41.53,20.6 41.53,20.93 41.2,21.26 40.88,21.26 U2.22 | C14.1 19.95,20.44 19.95,17.82 22.24,15.53 24.69,15.53 25.34,16.19 25.34,18.31 25.84,18.8 v25.84,20.27 24.85,21.26 C13.1 | v34.01,19.13 36.95,19.13
  Bottom 0.2: v34.01,19.13 26.98,19.13 v25.84,20.27
VLED  (50 unrouted)
VSYS  (18 unrouted)

## Text on the board
tDocu: BRANDING AREA (keep clear) | ORB 69 mm - ENGINEERING DRAFT